# Altium PCB Album-Player-v1.1.PcbDoc (part 2 of 2)
Units mil, origin at the board's own origin, x right, y up, seen from the top; angles counter-clockwise.
Board outline 2095.25 x 2016.26 mil, 4 copper layers (Top Layer, Ground, Power 3V3, Bottom Layer), stack 62.449 mil thick; 64 components, 36 nets, 241 pads, 57 vias.
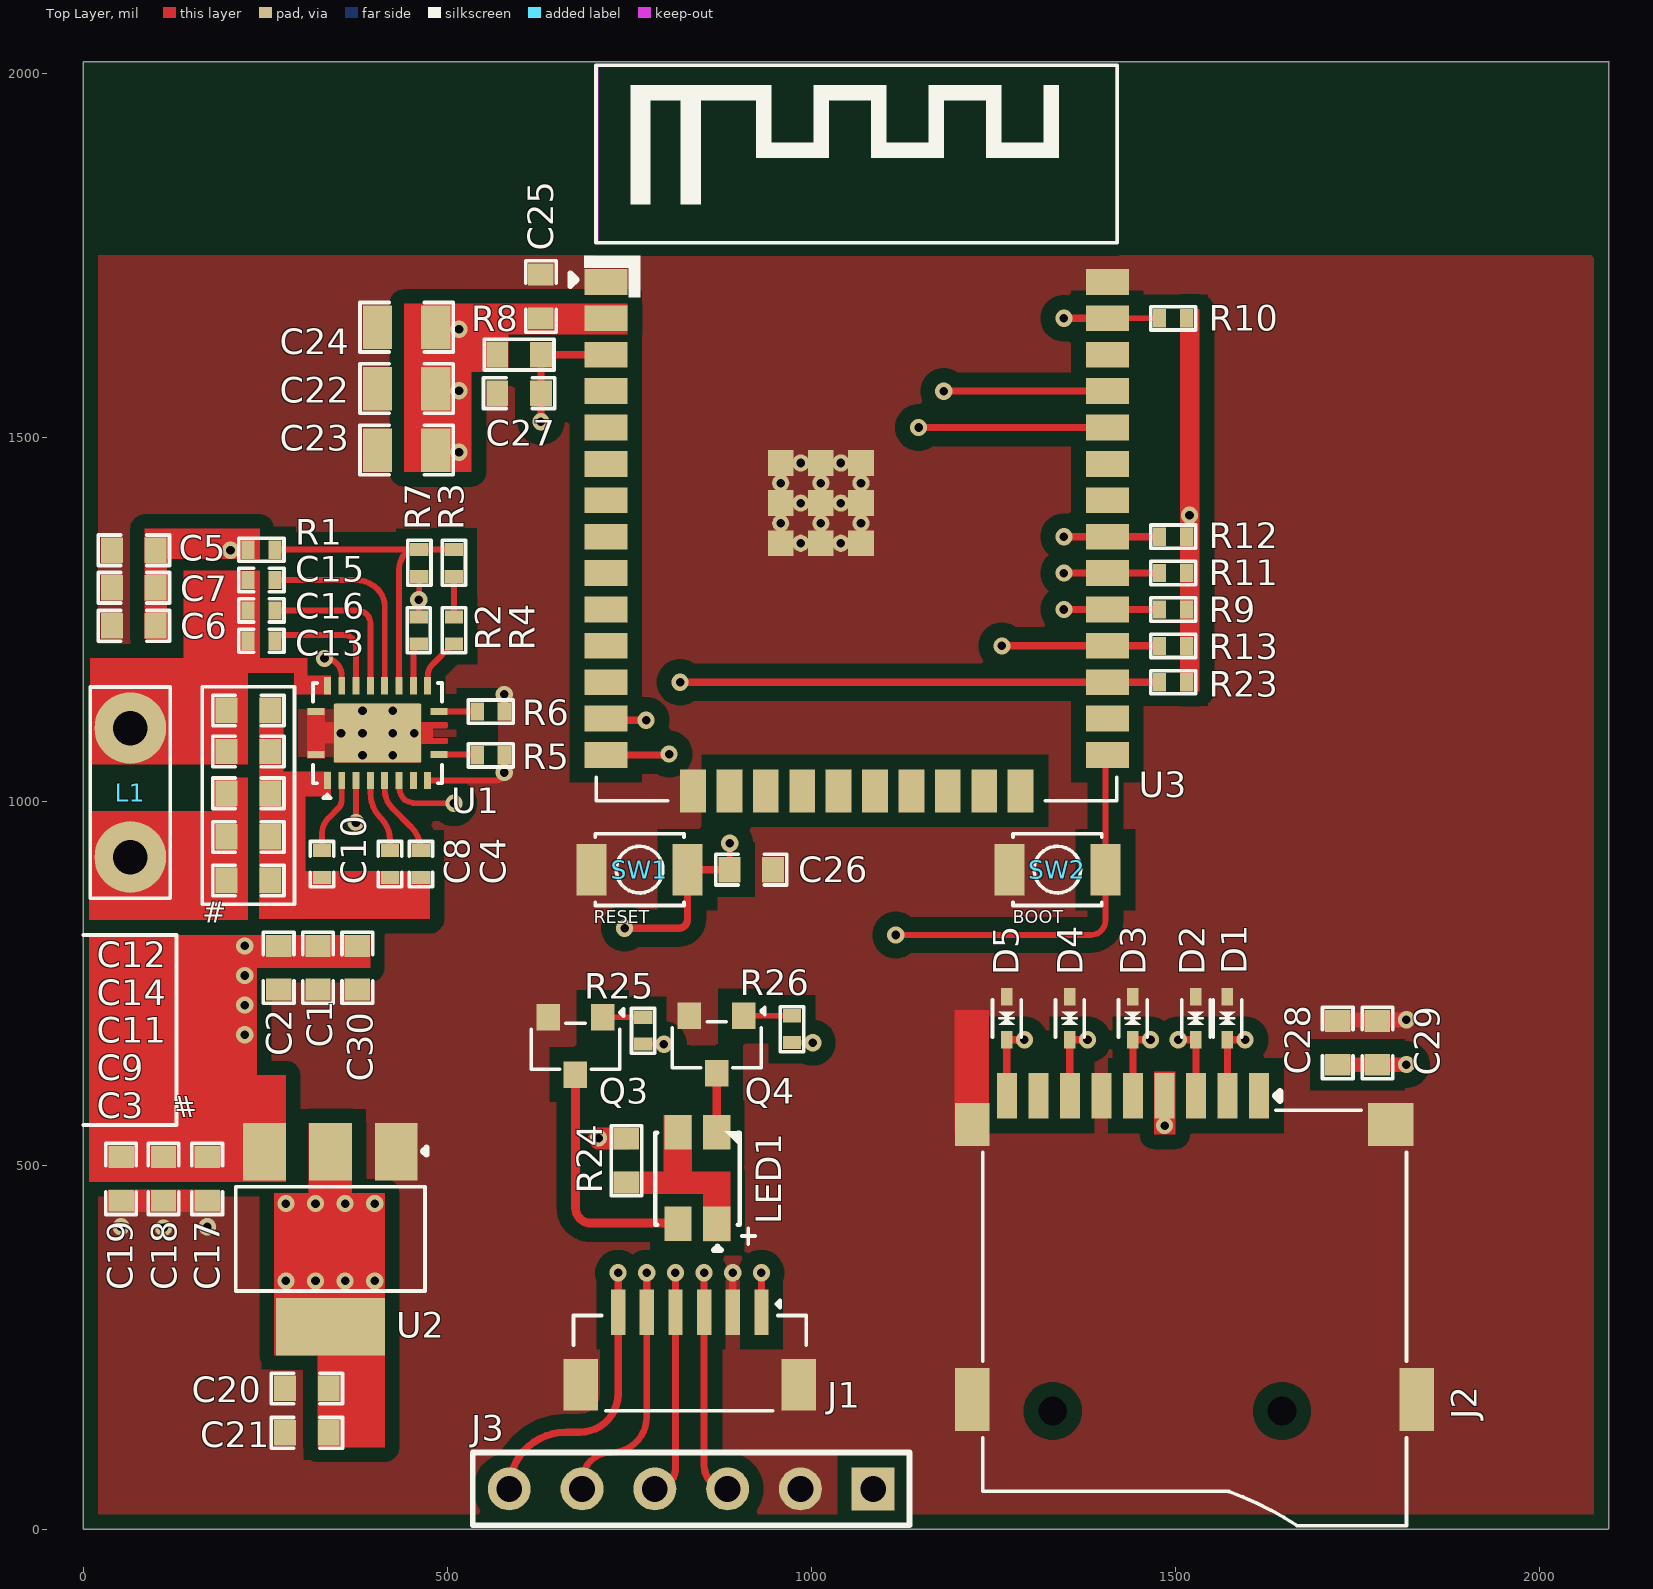
[diagram p0: Top Layer view]

## Part data (continued)
R24: library part RC0603FR-07470RL, "RES 470 OHM 1% 1/10W 0603", Case Code (Imperial)=0603, Case Code (Metric)=1608, LCSC Part Number=C114669, Manufacturer=Yageo, Max Operating Temperature=155°C, Max Power Dissipation=100mW, Min Operating Temperature=-55°C, Package Quantity=1, Resistance Tolerance=1%, Resistor Type="Thick Film", Supplier Part Number 1=311-470HRCT-ND, Temperature Coefficient=100ppm/°C, Voltage Rating=50V, Working Voltage=75V, Case/Package=0603, Category="Chip SMD Resistors", ComponentLink1Description=https://datasheet.ciiva.com/11808/0900766b80f96399-11808177.pdf?src-supplier=RSComponents, ComponentLink1URL=https://datasheet.ciiva.com/11808/0900766b80f96399-11808177.pdf?src-supplier=RSComponents, ComponentLink2Description=https://datasheet.ciiva.com/7746/1738695-7746359.pdf?src-supplier=Element14, ComponentLink2URL=https://datasheet.ciiva.com/7746/1738695-7746359.pdf?src-supplier=Element14, ComponentLink3Description=https://datasheet.ciiva.com/7746/1738695-7746360.pdf?src-supplier=Element14, ComponentLink3URL=https://datasheet.ciiva.com/7746/1738695-7746360.pdf?src-supplier=Element14, ComponentLink4Description=https://datasheet.ciiva.com/7660/1868787-7660793.pdf?src-supplier=Element14, ComponentLink4URL=https://datasheet.ciiva.com/7660/1868787-7660793.pdf?src-supplier=Element14, ComponentLink5Description=https://datasheet.ciiva.com/46440/1868787-46440907.pdf?src-supplier=Element14, ComponentLink5URL=https://datasheet.ciiva.com/46440/1868787-46440907.pdf?src-supplier=Element14, ComponentLink6Description=https://datasheet.ciiva.com/2454/pyu-r-int-thick-7-2454012.pdf?src-supplier=Digi-Key, ComponentLink6URL=https://datasheet.ciiva.com/2454/pyu-r-int-thick-7-2454012.pdf?src-supplier=Digi-Key, ComponentLink7Description=https://datasheet.ciiva.com/2454/pyu-r-int-thick-7-2454013.pdf?src-supplier=Digi-Key, ComponentLink7URL=https://datasheet.ciiva.com/2454/pyu-r-int-thick-7-2454013.pdf?src-supplier=Digi-Key, ComponentLink8Description=https://datasheet.ciiva.com/2454/pyu-r-int-thick-7-2454014.pdf?src-supplier=Digi-Key, ComponentLink8URL=https://datasheet.ciiva.com/2454/pyu-r-int-thick-7-2454014.pdf?src-supplier=Digi-Key, Construction=Rectangular, Depth=0.8mm, Features="Moisture Resistant", Height=0.022inch, Lead Free="Lead Free", Length=1.6mm, Manufacturer Part Number=RC0603FR-07470RL, Military Standard=Not, Number of Terminations=2, Packaging="Tape and Reel", Power Rating=100mW, Pricing 1="1=0.10000, 10=0.02400, 100=0.00970, 1000=0.00436, 2500=0.00378 (USD)", REACH SVHC="No SVHC", Resistance=470R, RoHS=Yes, RoHS Compliant=Yes, Series=RC, Stock 1=154083, Supplier 1=Digi-Key, Technology="THICK FILM", Termination=SMD/SMT, Tolerance=1%, Width=0.031inch
R25 R26: library part RC0402FR-071KL, "RES 1K OHM 1% 1/16W 0402", Case Code (Imperial)=0402, Case Code (Metric)=1005, LCSC Part Number=C106235, Manufacturer=Yageo, Max Operating Temperature=155°C, Max Power Dissipation=63mW, Min Operating Temperature=-55°C, Power Rating=62.5mW, Resistance=1kR, Resistance Tolerance=1%, Resistor Type="Thick Film", Temperature Coefficient=100ppm/°C, Voltage Rating=50V, Case/Package=0402, Category="Chip SMD Resistors", ComponentLink1Description=https://datasheet.ciiva.com/11819/0900766b80c66297-11819477.pdf?src-supplier=RSComponents, ComponentLink1URL=https://datasheet.ciiva.com/11819/0900766b80c66297-11819477.pdf?src-supplier=RSComponents, ComponentLink2Description=https://datasheet.ciiva.com/7983/1018594-7983502.pdf?src-supplier=Element14, ComponentLink2URL=https://datasheet.ciiva.com/7983/1018594-7983502.pdf?src-supplier=Element14, ComponentLink3Description=https://datasheet.ciiva.com/22747/1018594-22747513.pdf?src-supplier=Element14, ComponentLink3URL=https://datasheet.ciiva.com/22747/1018594-22747513.pdf?src-supplier=Element14, ComponentLink4Description=https://datasheet.ciiva.com/12666/pyu-rc0402-51-rohs-l-6-r-12666741.pdf?src-supplier=Mouser, ComponentLink4URL=https://datasheet.ciiva.com/12666/pyu-rc0402-51-rohs-l-6-r-12666741.pdf?src-supplier=Mouser, ComponentLink5Description=https://datasheet.ciiva.com/7849/1018594-7849869.pdf?src-supplier=Element14, ComponentLink5URL=https://datasheet.ciiva.com/7849/1018594-7849869.pdf?src-supplier=Element14, ComponentLink6Description=https://datasheet.ciiva.com/7849/1018594-7849871.pdf?src-supplier=Element14, ComponentLink6URL=https://datasheet.ciiva.com/7849/1018594-7849871.pdf?src-supplier=Element14, ComponentLink7Description=https://datasheet.ciiva.com/17063/pyu-rc0402-51-rohs-l-6-r-17063193.pdf?src-supplier=Future+Electronics, ComponentLink7URL=https://datasheet.ciiva.com/17063/pyu-rc0402-51-rohs-l-6-r-17063193.pdf?src-supplier=Future+Electronics, Construction=Rectangular, Depth=0.5mm, Features="Moisture Resistant", Height=0.32mm, Item Type=Resistor, Lead Free="Lead Free", Length=1mm, Manufacturer Part Number=RC0402FR-071KL, Military Standard=Not, Number of Pins=2, Number of Terminations=2, Packaging="Tape and Reel", Pricing 1="10000=0.00085, 20000=0.00087, 40000=0.00084, 60000=0.00083, 80000=0.00079, 100000=0.00078, 1000000=0.00076 (USD)", Reach SVHC Compliant=Yes, RoHS=Yes, RoHS Compliant=Yes, Series=RC, Size Code=0402, Stock 1=13030000, Supplier 1=Avnet, Supplier Part Number 1=RC0402FR-071KL, Technology="THICK FILM", Termination=SMD/SMT, Tolerance=1%, Voltage Rating (DC)=50V, Width=0.5mm
SW1 SW2: "None Without bracket 50mA 3.05mm 100000 Times 12V 160gf 2.5mm 1.5mm Round Button Standing paste SPST SMD Tactile Switches ROHS", LCSC Part Number=C843684, Manufacturer=G-Switch, Package=SMD, ComponentLink1Description=LCSC, ComponentLink1URL=https://www.lcsc.com/product-detail/Tactile-Switches_G-Switch-GT-TC032A-H015-L1_C843684.html?s_z=n_B3U-1000P, Item Type=Switch, Manufacturer Part Number=GT-TC032A-H015-L1
U1: "Wireless Power Receiver PMIC 20-VQFN (3.5x4.5)", Case/Package=VQFN, LCSC Part Number=C55663, Manufacturer="Texas Instruments", Max Operating Temperature=125°C, Min Operating Temperature=0°C, Operating Supply Current=1.5A, Output Voltage=5V, Package Quantity=3000, ComponentLink1Description=https://datasheet.ciiva.com/6601/bq51013b-6601292.pdf?src-supplier=Digikey, ComponentLink1URL=https://datasheet.ciiva.com/6601/bq51013b-6601292.pdf?src-supplier=Digikey, Contact Plating=Gold, Item Type=IC, Lead Free="Lead Free", Logic Function=Receiver, Manufacturer Part Number=BQ51013BRHLR, Mounting Technology="Surface Mount", Output Current=1.5A, Packaging="Tape and Reel", Pins=20, Pricing="1=3.34, 10=3, 50=3, 100=2.46, 1000=1.76, 10000=1.67 (USD)", RoHS=Yes, RoHS Compliant=Yes, Series=-, Stock=4754, Supplier=Mouser
U2: "SOT-223 Linear Voltage Regulators (LDO) ROHS", LCSC Part Number=C2992570, Manufacturer="GUOXIN JIAPIN SEMICONDUCTOR", Package=SOT-223, ComponentLink1Description=LCSC, ComponentLink1URL=https://www.lcsc.com/product-detail/Linear-Voltage-Regulators-LDO_GUOXIN-JIAPIN-SEMICONDUCTOR-AMS1117-3-3_C2992570.html, Item Type=IC, Manufacturer Part Number=AMS1117-3.3
U3: "RX TXRX MOD WIFI TRACE ANT SMD", LCSC Part Number=C701343, Manufacturer="Espressif Systems", Supplier Part Number 1=1965-ESP32-WROOM-32E-N16CT-ND, Category=Uncategorized, Item Type=IC, Manufacturer Part Number=ESP32-WROOM-32E-N16, Pricing 1="1=3.60000 (USD)", RoHS=No, Stock 1=16240, Supplier 1=Digi-Key

## Via types
v1: diameter 23.62, hole 11.81, Top Layer to Bottom Layer, tented both sides, 57 vias

## Nets (pads, with @x,y where several pads share a name; then routed paths per layer and width w, separated by ;. In a path a pad name is that pad's centre, name@x,y a point inside that pad or via, vN(x,y) a via of type N, cw(c..) or ccw(c..) an arc to the next point about the centre after c; other vN are vias at no path point)
3V3: C20.2 C21.2 C22.2 C23.2 C24.2 C25.1 C28.2 C29.2 J1.1 J2.4 J3.1 R8.2 R9.2 R10.2 R11.2 R12.2 R13.2 R23.1 U2.2 U2.4 U3.2 | length 148.9
  Top Layer w10: J1.1 v1(931.43,352.14)
  Top Layer w20: C28.2 1817.57,637.89 v1(1817.57,638.14)
  other v1: 278.18,340.96 318.86,340.96 359.54,340.96 400.22,340.96 278.18,447.14 318.86,447.14 359.54,447.14 400.22,447.14 1485.33,554.25 1519.55,1392.91 515.99,1479.48 515.99,1563.93 516,1648.38
AC1: C3.2 C4.1 C8.1 C9.2 C10.1 C11.2 C12.2 C14.2 U1.2
AC2: C12.1 C13.1 C14.1 C15.1 C16.1 L1.1 U1.19
EN1: R5.1 U1.10 | length 52.7
  Top Layer w8: U1.10 538.68,1063.97 cw(c538.68,1060.6) R5.1
EN2: R6.1 U1.11 | length 52.4
  Top Layer w8: U1.11 R6.1
ESP-EN: C26.1 C27.2 J1.6 J3.6 R8.1 SW1.2 U3.3 | length 2103.7
  Top Layer w8: C26.1 888,906.45 v1(888,942.14)
  Top Layer w10: J3.6 cw(c663,55.14) 663,133.14 682,133.14 ccw(c682,185.71) 734.57,185.71 J1.6 v1(734.57,352.14) ; v1(628.53,1521.19) C27.2 R8.1 U3.3 ; v1(743.45,825.33) 817.63,825.33 ccw(c817.63,837.61) 829.91,837.61 SW1.2 C26.1
  Power 3V3 w10: v1(628.53,1521.19) 792.53,1521.19 cw(c792.53,1421.19) 863.24,1491.9 873,1482.14 ; v1(734.57,352.14) 734.57,784.79 cw(c746.84,784.79) 738.17,793.47 ccw(c725.4,806.23) 743.45,806.23 v1(743.45,825.33) ; 873.01,1482.13 cw(c836.79,1445.92) 888,1445.92 v1(888,942.14)
GND: C1.2 C2.1 C5.1 C6.1 C7.1 C17.1 C18.1 C19.1 C20.1 C21.1 C22.1 C23.1 C24.1 C25.2 C26.2 C27.1 C28.1 C29.1 C30.1 D1.1 D2.1 D3.1 D4.1 D5.1 J1.2 J1.MP1 J1.MP2 J2.6 J2.9 J2.10 J2.11 J2.12 J3.2 Q3.2 Q4.2 R4.2 R5.2 R6.2 R7.2 SW1.1 SW2.1 U1.1 U1.9 U1.20 U1.21 U1.22 U1.23 U1.24 U1.25 U1.26 U1.27 U1.28 U1.29 U2.1 U3.1 U3.15 U3.38 U3.39 U3.39_10 U3.39_11 U3.39_12 U3.39_13 U3.39_14 U3.39_15 U3.39_16 U3.39_17 U3.39_18 U3.39_19 U3.39_20 U3.39_21 U3.40 U3.41 U3.42 U3.43 U3.44 U3.45 U3.46 U3.47 | length 362.9
  Top Layer w8: R4.2 v1(460.66,1276.78) ; v1@461.4,1276.78 R7.2 ; U1.9 567.23,1028.53 ccw(c567.23,1039.36) v1(578.06,1039.36) R5.2 ; R6.2 v1(578.06,1146.64)
  Top Layer w10: J1.2 v1(892.06,352.14)
  Top Layer w20: C28.1@1723.25,699.38 v1@1817.57,699.38
  other v1: 110.01,413.82 51.67,415.33 170,415.33 1817.57,699.63
ILIM: R1.2 R3.2 R7.1 U1.14 | length 446.9
  Top Layer w8: R1.2 263.04,1345.91 R7.1@457,1345.91 ; U1.14 433.55,1317.91 cw(c467.18,1317.91) 443.4,1341.7 445.3,1343.6 cw(c457,1315.19) R7.1@457,1345.91 ; R3.2 R7.1 R7.1@457,1345.91
IO0: J1.5 J3.5 SW2.2 U3.25 | length 1632.6
  Top Layer w8: v1(1116,816.14) 1383.99,816.14 ccw(c1383.99,836.15) 1404,836.15 SW2.2 1404,1063.38 U3.25
  Top Layer w9: J3.5 685,65.4 cw(c724.73,65.4) 724.73,105.14 ccw(c724.73,154.35) 773.94,154.35 J1.5
  Top Layer w10: J1.5 v1(773.94,352.14)
  Power 3V3 w10: v1(773.94,352.14) 773.94,544.89 cw(c849.25,544.89) 796,598.14 cw(c834.63,559.51) 834.63,614.14 1062.37,614.14 ccw(c1062.37,668.76) 1101,630.14 ccw(c1064.79,666.35) 1116,666.35 v1(1116,816.14)
LED_G: R26.1 U3.14 | length 681.1
  Top Layer w8: R26.1 v1(1001.84,668.19)
  Top Layer w10: U3.14 805.58,1063.38 v1(804.62,1064.72) cw(c804.62,1057.97) v1@809.39,1062.74
  Power 3V3 w10: v1(804.62,1064.72) 804.62,758.48 ccw(c904.62,758.48) 804.84,751.82 ccw(c904.62,758.48) 833.9,687.77 ccw(c881.17,735.04) 881.17,668.19 v1(1001.84,668.19)
LED_R: R25.1 U3.13 | length 535.8
  Top Layer w8: R25.1 v1(797.42,666.14)
  Top Layer w10: U3.13 ccw(c723.2,1118.8) 723.2,1111.14 v1(773,1111.14)
  Power 3V3 w10: v1(773,1111.14) 773,737.69 ccw(c804.19,737.69) 782.13,715.64 cw(c745.23,678.73) 797.42,678.73 v1(797.42,666.14)
NetC3_1: C3.1 C9.1 C11.1 L1.2
NetC4_2: C4.2 U1.5 | length 103.7
  Top Layer w8: U1.5 394.18,1011.63 ccw(c443.68,1011.63) 408.68,976.63 cw(c378.5,946.45) 421.18,946.45 C4.2
NetC8_2: C8.2 U1.6 | length 113.5
  Top Layer w8: U1.6 413.86,1016.28 ccw(c450.83,1016.28) 424.69,990.14 449.84,964.99 cw(c416.88,932.02) C8.2
NetC10_2: C10.2 U1.3 | length 105.7
  Top Layer w8: C10.2 327.81,955.48 cw(c357.71,955.48) 336.57,976.63 350.08,990.14 ; 350.09,990.15 ccw(c338.68,1001.55) 354.81,1001.55 U1.3
NetC13_2: C13.2 U1.17 | length 178.6
  Top Layer w8: C13.2 cw(c271.05,1220.41) 271.05,1228.41 357.39,1228.41 cw(c357.39,1211.31) 374.49,1211.31 U1.17
NetC15_2: C15.2 U1.15 | length 279.8
  Top Layer w8: C15.2 373.81,1303.88 cw(c373.81,1261.2) 403.99,1291.38 cw(c380.15,1267.54) 413.86,1267.54 U1.15
NetC16_2: C16.2 U1.16 | length 227.1
  Top Layer w8: C16.2 376.19,1262.15 cw(c376.19,1244.16) 394.18,1244.16 U1.16
NetLED1_1: LED1.1 LED1.3 R24.2
NetLED1_2: LED1.2 Q3.3 | length 336.5
  Top Layer w12: Q3.3 676,441.35 ccw(c697,441.35) 697,420.35 815.74,420.35 cw(c815.74,419.25) LED1.2
NetLED1_4: LED1.4 Q4.3 | length 81.2
  Top Layer w12: LED1.4 Q4.3
NetQ3_1: Q3.1 R25.2 | length 55.6
  Top Layer w8: Q3.1 R25.2
NetQ4_1: Q4.1 R26.2 | length 66
  Top Layer w8: Q4.1 R26.2
NetR2_1: R2.1 U1.12 | length 72.3
  Top Layer w8: U1.12 472.92,1171.5 cw(c496.44,1171.5) 479.81,1188.14 506.96,1215.28 cw(c509.06,1213.18) R2.1
NetR2_2: R2.2 R3.1 | length 55.9
  Top Layer w8: R3.1 509.06,1308.67 R2.2
NetR4_1: R4.1 U1.13 | length 59.7
  Top Layer w8: U1.13 453.23,1198.23 cw(c478.59,1198.23) R4.1
NetR23_2: R23.2 U1.7 U3.27 | length 1204.5
  Top Layer w8: U1.7 433.55,1020.96 ccw(c461,1020.96) 441.59,1001.55 ccw(c458.19,1030.6) 458.19,997.14 v1(509,997.14)
  Top Layer w10: v1(819.75,1163.38) U3.27 R23.2
  Power 3V3 w10: v1(509,997.14) 704.75,997.14 ccw(c704.75,1009.29) 713.34,1000.7 ccw(c697.26,1016.77) 720,1016.77 720,1117.47 cw(c760.51,1117.47) 733.57,1147.72 cw(c771.37,1109.93) 771.37,1163.38 v1(819.75,1163.38)
RECT: C5.2 C6.2 C7.2 R1.1 U1.18 | length 314.4
  Top Layer w8: v1(331.19,1196.17) cw(c331.19,1172.55) 354.81,1172.55 U1.18
  Power 3V3 w10: v1(202,1344.69) 295.1,1344.69 cw(c295.1,1305.24) 323,1333.14 cw(c303.24,1313.37) 331.19,1313.37 v1(331.19,1196.17)
RXD0: J1.4 J3.4 U3.34 | length 2019.7
  Top Layer w10: J3.4 ccw(c785,83.45) 813.31,83.45 J1.4 v1(813.31,352.14) ; v1@1146.32,1513.38 U3.34
  Power 3V3 w10: v1(813.31,352.14) 813.31,524.43 cw(c883.61,524.43) 833.9,574.14 cw(c869.11,538.94) 869.11,588.72 1090.95,588.72 ccw(c1090.95,648.19) 1133,606.14 ccw(c1099.2,639.94) 1147,639.94 v1@1147,1513.38
  other v1: 1147.32,1513.38
SD_CLK: D3.2 J2.5 R11.1 U3.30 | length 934.6
  Top Layer w10: v1(1347,1313.38) U3.30 R11.1 ; J2.5 D3.2 v1(1466.01,672.19)
  Power 3V3 w10: v1(1347,1313.38) 1336.26,1302.64 ccw(c1375.53,1263.38) 1320,1263.38 1320,953.56 ccw(c1420,953.56) 1349.29,882.85 1436.72,795.42 cw(c1366.01,724.71) 1466.01,724.71 v1(1466.01,672.19)
SD_CS: D1.2 J2.2 R9.1 U3.29 | length 918.4
  Top Layer w10: v1(1347,1263.38) U3.29 R9.1 ; J2.2 D1.2 v1(1595.93,672.2)
  Power 3V3 w10: v1(1347,1263.38) 1347,1021.56 ccw(c1447,1021.56) 1376.29,950.85 1566.64,760.5 cw(c1495.93,689.79) 1595.93,689.79 v1(1595.93,672.2)
SD_DET: D5.2 J2.CD R13.1 U3.28 | length 867.3
  Top Layer w10: v1(1261.84,1213.38) U3.28 R13.1 ; J2.CD D5.2 v1(1292.78,672.19)
  Power 3V3 w10: v1(1261.84,1213.38) 1261.84,903.21 ccw(c1308.14,903.21) 1275.4,870.48 cw(c1233.45,828.53) 1292.78,828.53 v1(1292.78,672.19)
SD_MISO: D4.2 J2.7 R12.1 U3.31 | length 966.7
  Top Layer w10: v1(1347,1363.38) U3.31 R12.1 ; J2.7 D4.2 v1(1379.39,672.19)
  Power 3V3 w10: v1(1347,1363.38) 1325.29,1341.67 ccw(c1396,1270.96) 1296,1270.96 1296,944.29 ccw(c1396,944.29) 1325.29,873.58 1350.1,848.76 cw(c1279.39,778.05) 1379.39,778.05 v1(1379.39,672.19)
SD_MOSI: D2.2 J2.3 R10.1 U3.37 | length 1493.4
  Top Layer w8: U3.37 R10.1
  Top Layer w10: v1(1347,1663.38) U3.37 ; v1(1504.17,672.19) D2.2 J2.3
  Power 3V3 w10: v1(1347,1663.38) 1351.38,1659 cw(c1280.67,1588.29) 1380.67,1588.29 1380.67,1026.89 ccw(c1480.67,1026.89) 1409.96,956.18 1604.42,761.71 cw(c1537.85,695.14) 1632,695.14 1632,668.83 cw(c1598.87,668.83) 1622.3,645.41 cw(c1594.09,673.61) 1594.09,633.72 1566.64,633.72 cw(c1566.64,691.67) 1525.69,650.67 ; v1(1504.17,672.19) 1525.66,650.7
TXD0: J1.3 J3.3 U3.35 | length 2022.7
  Top Layer w10: v1(852.68,352.14) J1.3 852.68,87.45 ccw(c885,87.45) J3.3 ; v1(1182,1563.14) 1182.24,1563.38 U3.35
  Power 3V3 w10: v1(852.68,352.14) 852.68,510.56 cw(c911.78,510.56) 869.99,552.35 cw(c888.8,533.54) 888.8,560.14 1093.05,560.14 ccw(c1093.05,644.5) 1122.1,565.29 ccw(c1093.05,644.5) 1152.69,584.83 ; 1152.71,584.85 ccw(c1082,655.56) 1182,655.56 v1(1182,1563.14)
VCC_SYS: C1.1 C2.2 C17.2 C18.2 C19.2 C30.2 R24.1 U1.4 U2.3 | length 401.3
  Top Layer w8: v1@373.51,968.33 ccw(c371.13,970.71) v1(374.49,970.71) U1.4
  Top Layer w30: v1@708.18,536.65 R24.1@745.99,536.65
  Power 3V3 w10: v1(221.55,801.14) 326.63,801.14 ccw(c326.63,852.35) 362.84,816.14 ccw(c334.71,844.27) 374.49,844.27 v1(374.49,970.71)
  other v1: 707.76,537.07 221.55,679.09 221.55,719.77 221.55,760.45
pads on no net: J2. J2.1 J2.8 U1.8 U3.4 U3.5 U3.6 U3.7 U3.8 U3.9 U3.10 U3.11 U3.12 U3.16 U3.17 U3.18 U3.19 U3.20 U3.21 U3.22 U3.23 U3.24 U3.26 U3.32 U3.33 U3.36

## Polygon pours and split planes (outlines as drawn)
3V3 on Power 3V3 "3V3_L03_P001" (solid, pour order 1): 0,469.68 0,0 2095.25,0 2095.25,2016.26 0,2016.26 0,1452.14 738.17,1452.14 738.17,496.14 0,496.14
GND on Power 3V3 "GND_L03_P002" (solid, remove dead copper, pour order 2): 0,0 0,2016.14 2095.13,2016.14 2095.25,2016.26 2095.25,0.13 2095.13,0
VCC_SYS on Power 3V3 "VCC_SYS_L03_P000" (solid, remove dead copper, pour order 0): 0,827.11 722.31,827.11 722.31,496.14 0,496.14
GND on Ground "GND_L02_P004" (solid, remove dead copper, pour order 4): 0,0 0,2016.14 2095.13,2016.14 2095.25,2016.26 2095.25,0.13 2095.13,0
GND on Bottom Layer "GND_L04_P003" (solid, remove dead copper, pour order 3): 0,0 0,2016.14 2095.13,2016.14 2095.25,2016.26 2095.25,0.13 2095.13,0
GND on Top Layer "GND_L01_P005" (solid, remove dead copper, pour order 5): 0,0 0,2016.14 2095.13,2016.14 2095.25,2016.26 2095.25,0.13 2095.13,0

## Other copper
Top Layer:
  region net GND: 34.17,466.14 34.17,436.14 187.5,436.14 187.5,466.14
  region net GND: 307.56,1127.74 307.56,1059.24 331.19,1059.24 331.19,1127.74
  pour cut-out: 0,2016.14 0,1749.71 2095.13,1749.71 2095.13,2016.14
  region net NetLED1_1: 852.68,460.82 852.68,490.82 728.5,490.82 728.5,460.82
  region net NetLED1_1: 835.55,568.85 835.55,490.82 888.7,490.82 888.7,442.87 888.7,395.62 851.29,395.62 851.29,460.82 797.42,460.82 797.42,568.13 cw(c798.14,568.13) 798.14,568.85 836.42,568.85
  region net 3V3: 1499.87,542.14 1471.31,542.14 1471.31,628.14 1499.87,628.14
  region net 3V3: 1506.55,1675.88 1506.55,1150.88 1533,1150.88 1533,1675.88
  region net 3V3: 309.67,557.59 309.67,461.14 262,461.14 262,238.69 322,238.69 322,112.14 414,112.14 414,461.14 368.73,461.14 368.73,557.59
  region net VCC_SYS: 393.75,816.14 393.75,771.14 238,771.14 238,623.19 278.18,623.19 278.18,477.14 8,477.14 8,816.14
  region net NetC3_1: 226,971.83 226,1031.83 177.55,1031.83 177.55,971.83
  region net RECT: 114.18,1332.88 114.18,1223.41 84.18,1223.41 84.18,1374.14 242,1374.14 242,1332.88
  region net AC1: 241.54,1142.15 241.54,838.14 476,838.14 476,904.02 304.75,904.02 304.75,1006.94 339.85,1006.94 339.85,1040.34 274.78,1040.34 274.78,1142.15
  region net NetC3_1: 226,986.14 8,986.14 8,837.14 226,837.14
  region net AC2: 9.38,1196.17 9.38,1050.73 226.04,1050.73 226.04,1176.14 289.92,1176.14 289.92,1146.64 339.85,1146.64 339.85,1172.55 307.56,1172.55 307.56,1196.17 242,1196.17 242,1316.38 138,1316.38 138,1196.17
  region net 3V3: 747.31,1641.56 583.53,1641.56 583.53,1590.14 532.84,1590.14 532.84,1452.24 441.05,1452.24 441.05,1683.1 747.31,1683.1 747.31,1665.38
  region net GND: 1243.93,712.62 1196.69,712.62 1196.69,543.89 1243.93,543.89
Ground:
  pour cut-out: 0,2016.14 0,1749.71 2095.13,1749.71 2095.13,2016.14
Power 3V3:
  pour cut-out: 0,2016.14 0,1749.71 2095.13,1749.71 2095.13,2016.14
Bottom Layer:
  pour cut-out: 0,2016.14 0,1749.71 2095.13,1749.71 2095.13,2016.14

## Silkscreen, mask and mechanical layers (free items; w line width, h text height)
Top Overlay:
  lines w5: 0,555.14 127.92,555.14 127.92,816.22 0,816.22 ; 163.18,858.58 163.18,1157.14 289.92,1157.14 289.92,858.58 163.18,858.58
  text "RESET" at 701,826 h30
  text "BOOT" at 1277,826 h30
  text "#" at 163,823.67 h50
  text "#" at 156.18,556.23 h50
Board Outline:
  lines w5: 0,0 18.55,0 2095.13,0 2095.25,0.13 2095.25,2016.26 2095.13,2016.14 30,2016.14 0,2016.14 0,0
Fabrication:
  drawing of 465 lines, arcs and shapes, not listed
  text "Layer" at 4622.5,1696.14 h60
  text "Name" at 5032.41,1696.14 h60
  text "Material" at 5962.16,1696.14 h60
  text "Thickness" at 6821.92,1696.14 h60
  text "Constant" at 7471.76,1696.14 h60
  text "Board Layer Stack" at 8041.62,1696.14 h60
  text "Top Overlay" at 5032.41,1576.14 h60
  text "Top Solder" at 5032.41,1456.14 h60
  text "Solder Resist" at 5962.16,1456.14 h60
  text "0.40mil" at 6821.92,1456.14 h60
  text "3.5" at 7471.76,1456.14 h60
  text "1" at 4622.5,1336.14 h60
  text "Top Layer" at 5032.41,1336.14 h60
  text "1.38mil" at 6821.92,1336.14 h60
  text "Dielectric 2" at 5032.41,1216.14 h60
  text "PP-006" at 5962.16,1216.14 h60
  text "8.28mil" at 6821.92,1216.14 h60
  text "4.1" at 7471.76,1216.14 h60
  text "2" at 4622.5,1096.14 h60
  text "Ground" at 5032.41,1096.14 h60
  text "CF-004" at 5962.16,1096.14 h60
  text "0.60mil" at 6821.92,1096.14 h60
  text "Dielectric 1" at 5032.41,976.14 h60
  text "FR-4" at 5962.16,976.14 h60
  text "41.93mil" at 6821.92,976.14 h60
  text "4.8" at 7471.76,976.14 h60
  text "3" at 4622.5,856.14 h60
  text "Power 3V3" at 5032.41,856.14 h60
  text "CF-004" at 5962.16,856.14 h60
  text "0.60mil" at 6821.92,856.14 h60
  text "Dielectric 3" at 5032.41,736.14 h60
  text "PP-006" at 5962.16,736.14 h60
  text "8.28mil" at 6821.92,736.14 h60
  text "4.1" at 7471.76,736.14 h60
  text "4" at 4622.5,616.14 h60
  text "Bottom Layer" at 5032.41,616.14 h60
  text "1.38mil" at 6821.92,616.14 h60
  text "Bottom Solder" at 5032.41,496.14 h60
  text "Solder Resist" at 5962.16,496.14 h60
  text "0.40mil" at 6821.92,496.14 h60
  text "3.5" at 7471.76,496.14 h60
  text "Bottom Overlay" at 5032.41,376.14 h60
  text "Total board thickness:" at 4622.5,256.14 h60
  text "63.25mil" at 6821.92,256.14 h60
Drill Drawing:
  circle w10: c4611.62,2489.83 r33.33
  lines w10: 4578.29,2156.5 4644.96,2156.5 4644.96,2223.17 4578.29,2223.17 4578.29,2156.5 ; 4578.29,2373.17 4644.96,2373.17 4611.62,2306.5 4578.29,2373.17 ; 4578.29,2623.17 4594.96,2623.17 4594.96,2606.5 4628.29,2606.5 4628.29,2623.17 4644.96,2623.17 4644.96,2656.5 4628.29,2656.5 4628.29,2673.17 4594.96,2673.17 4594.96,2656.5 4578.29,2656.5 4578.29,2623.17
  lines w15: 4518.5,2111.5 17222.96,2111.5 ; 4518.5,2711.5 17222.96,2711.5 ; 5069.38,1961.5 5069.38,2861.5 ; 5609.24,1961.5 5609.24,2861.5 ; 6708.92,1961.5 6708.92,2861.5 ; 7214.79,1961.5 7214.79,2861.5 ; 7948.59,1961.5 7948.59,2861.5 ; 9448.14,1961.5 9448.14,2861.5 ; 10037.99,1961.5 10037.99,2861.5 ; 10783.79,1961.5 10783.79,2861.5 ; 11433.62,1961.5 11433.62,2861.5 ; 12287.38,1961.5 12287.38,2861.5 ; 13620.99,1961.5 13620.99,2861.5 ; 14954.6,1961.5 14954.6,2861.5 ; 15820.36,1961.5 15820.36,2861.5 ; 4518.5,1961.5 17222.96,1961.5 17222.96,2861.5 4518.5,2861.5 4518.5,1961.5
  text "Symbol" at 4608.5,2756.5 h72
  text "Count" at 5114.38,2756.5 h72
  text "Hole Size" at 5654.24,2756.5 h72
  text "Plated" at 6753.92,2756.5 h72
  text "Hole Type" at 7259.79,2756.5 h72
  text "Drill Layer Pair" at 7993.59,2756.5 h72
  text "Via/Pad" at 9493.14,2756.5 h72
  text "Pad Shape" at 10082.99,2756.5 h72
  text "Template" at 10828.79,2756.5 h72
  text "Description" at 11478.62,2756.5 h72
  text "Hole Tolerance (+)" at 12332.38,2756.5 h72
  text "Hole Tolerance (-)" at 13665.99,2756.5 h72
  text "Hole Length" at 14999.6,2756.5 h72
  text "Routed Path Length" at 15865.36,2756.5 h72
  text "2" at 5114.38,2606.5 h60
  text "1.000mm (39.37mil)" at 5654.24,2606.5 h60
  text "NPTH" at 6753.92,2606.5 h60
  text "Round" at 7259.79,2606.5 h60
  text "Top Layer - Bottom Layer" at 7993.59,2606.5 h60
  text "Pad" at 9493.14,2606.5 h60
  text "Rounded" at 10082.99,2606.5 h60
  text "c0hn100p0" at 10828.79,2606.5 h60
  text "-" at 14999.6,2606.5 h60
  text "-" at 15865.36,2606.5 h60
  text "2" at 5114.38,2456.5 h60
  text "1.200mm (47.24mil)" at 5654.24,2456.5 h60
  text "PTH" at 6753.92,2456.5 h60
  text "Round" at 7259.79,2456.5 h60
  text "Top Layer - Bottom Layer" at 7993.59,2456.5 h60
  text "Pad" at 9493.14,2456.5 h60
  text "Rounded" at 10082.99,2456.5 h60
  text "c250h120" at 10828.79,2456.5 h60
  text "-" at 14999.6,2456.5 h60
  text "-" at 15865.36,2456.5 h60
  text "6" at 5114.38,2306.5 h60
  text "0.900mm (35.43mil)" at 5654.24,2306.5 h60
  text "PTH" at 6753.92,2306.5 h60
  text "Round" at 7259.79,2306.5 h60
  text "Top Layer - Bottom Layer" at 7993.59,2306.5 h60
  text "Pad" at 9493.14,2306.5 h60
  text "(Mixed)" at 10082.99,2306.5 h60
  text "(Mixed)" at 10828.79,2306.5 h60
  text "-" at 14999.6,2306.5 h60
  text "-" at 15865.36,2306.5 h60
  text "77" at 5114.38,2156.5 h60
  text "0.300mm (11.81mil)" at 5654.24,2156.5 h60
  text "PTH" at 6753.92,2156.5 h60
  text "Round" at 7259.79,2156.5 h60
  text "Top Layer - Bottom Layer" at 7993.59,2156.5 h60
  text "(Mixed)" at 9493.14,2156.5 h60
  text "Rounded" at 10082.99,2156.5 h60
  text "(Mixed)" at 10828.79,2156.5 h60
  text "-" at 14999.6,2156.5 h60
  text "-" at 15865.36,2156.5 h60
  text "87 Total" at 5114.38,2006.5 h60

## Dimensions
2095.13,2016.14 to 2095.13,0 on Fabrication
0,2016.14 to 2095.25,2016.26 on Fabrication